# Altium PCB Kasli-DIOT.PCBDOC (part 22 of 23)
Units mm, origin at the board's own origin, x right, y up, seen from the top; angles counter-clockwise.
Board outline 222.9 x 100 mm, 10 copper layers (TopLayer, Layer 2, Layer 3, Layer 4, Layer 5, Layer 6, Layer 7, layer 8, Layer 9, BottomLayer), stack 1.564 mm thick; 977 components, 900 nets, 4676 pads, 2725 vias.
Unrouted connection lines stored in the file: 17.
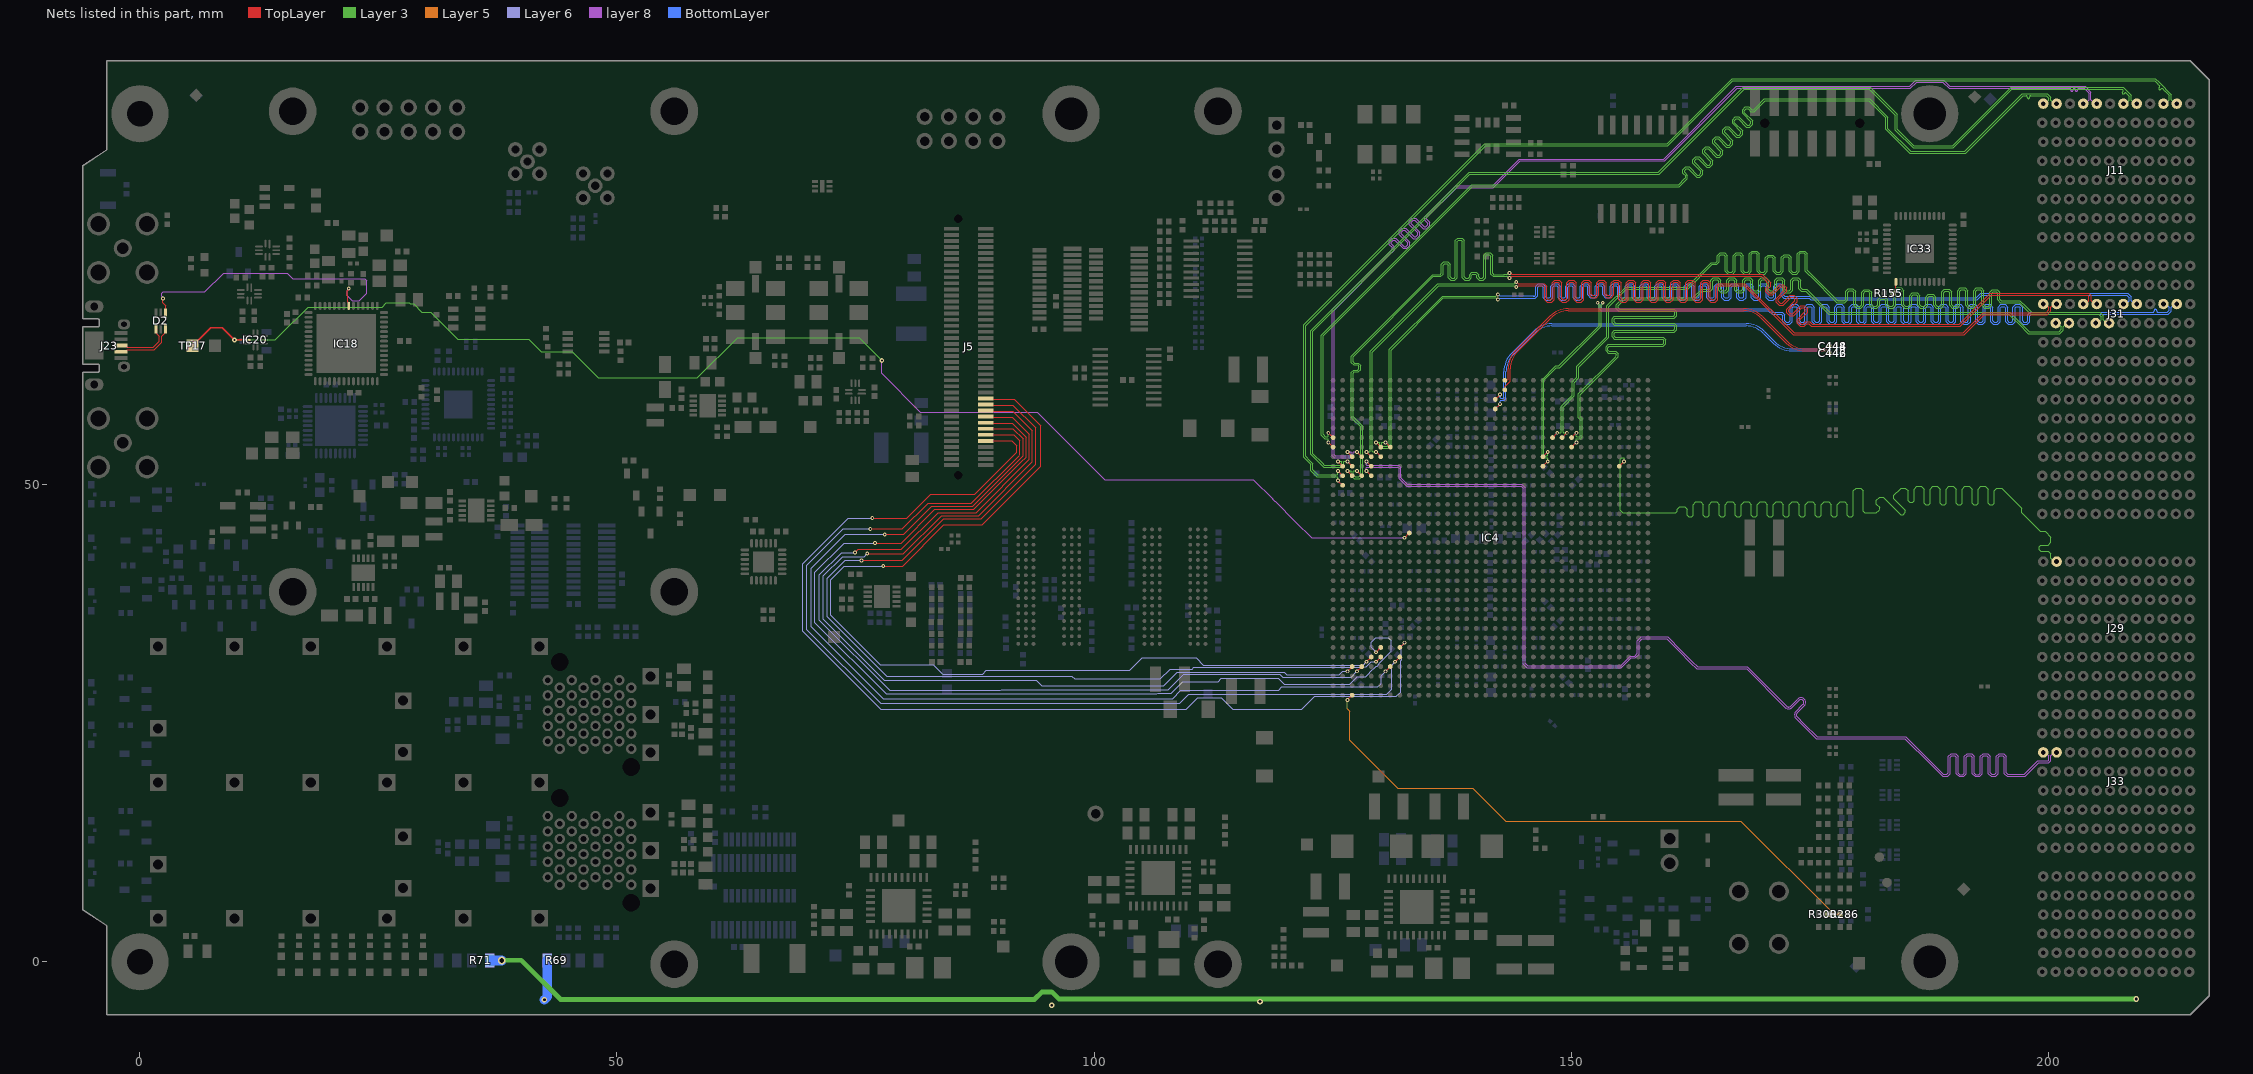
[diagram p28: the nets of this part, all layers, seen from the top]

## Via types
v1: diameter 0.4, hole 0.2, TopLayer to BottomLayer, tented both sides, 1723 vias
v2: diameter 0.5, hole 0.2, TopLayer to BottomLayer, tented both sides, 524 vias
v3: diameter 0.6, hole 0.3, TopLayer to BottomLayer, tented both sides, 172 vias
v4: diameter 0.6, hole 0.3, TopLayer to BottomLayer, 113 vias
v5: diameter 0.5, hole 0.2, TopLayer to BottomLayer, 107 vias
v6: diameter 0.4, hole 0.2, TopLayer to BottomLayer, 67 vias
v7: diameter 0.5, hole 0.25, TopLayer to BottomLayer, tented both sides, 12 vias
v8: diameter 0.8, hole 0.5, TopLayer to BottomLayer, tented both sides, 7 vias

## Nets (pads, with @x,y where several pads share a name; then routed paths per layer and width w, separated by ;. In a path a pad name is that pad's centre, name@x,y a point inside that pad or via, vN(x,y) a via of type N, cw(c..) or ccw(c..) an arc to the next point about the centre after c; other vN are vias at no path point) (continued)
SLOT8.LVDS_4_P: IC4.K31 J29.K8 | length 117
  TopLayer w0.095: IC4.K31@155.061,51.95 v1(155.561,52.45)
  Layer 3 w0.075: v1(155.561,52.45) 155.561,52.805 155.517,52.849 155.307,52.849 155.161,52.703 155.161,47.335 155.444,47.052 160.887,47.052 160.984,47.052 161.143,47.211 161.143,47.43 161.42,47.707 161.906,47.707 162.184,47.43 162.184,46.808 162.343,46.649 162.662,46.649 162.821,46.808 162.821,47.921 163.098,48.199 163.584,48.199 163.862,47.921 163.862,46.808 164.021,46.649 164.34,46.649 164.499,46.808 164.499,47.921 164.776,48.199 165.262,48.199 165.54,47.921 165.54,46.808 165.699,46.649 166.018,46.649 166.177,46.808 166.177,47.921 166.454,48.199 166.94,48.199 167.218,47.921 167.218,46.808 167.377,46.649 167.696,46.649 167.855,46.808 167.855,47.921 168.132,48.199 168.618,48.199 168.896,47.921 168.896,46.808 169.055,46.649 169.374,46.649 169.533,46.808 169.533,47.921 169.81,48.199 170.296,48.199 170.574,47.921 170.574,46.808 170.733,46.649 171.052,46.649 171.211,46.808 171.211,47.921 171.488,48.199 171.974,48.199 172.252,47.921 172.252,46.808 172.411,46.649 172.73,46.649 172.889,46.808 172.889,47.921 173.166,48.199 173.652,48.199 173.93,47.921 173.93,46.808 174.089,46.649 174.408,46.649 174.567,46.808 174.567,47.921 174.844,48.199 175.33,48.199 175.608,47.921 175.608,46.808 175.767,46.649 176.086,46.649 176.245,46.808 176.245,47.921 176.522,48.199 177.008,48.199 177.286,47.921 177.286,46.808 177.445,46.649 177.764,46.649 177.923,46.808 177.923,47.921 178.2,48.199 178.686,48.199 178.964,47.921 178.964,46.808 179.123,46.649 179.442,46.649 179.601,46.808 179.601,49.359 179.878,49.636 180.364,49.636 180.642,49.359 180.642,47.211 180.801,47.052 181.126,47.052 181.995,47.052 182.29,47.346 182.358,47.415 182.358,47.64 182.016,47.982 182.016,48.375 182.359,48.718 182.752,48.718 184.585,46.885 184.81,46.885 185.035,47.11 185.035,47.336 183.853,48.517 183.853,48.91 184.536,49.593 184.595,49.652 184.791,49.652 185.055,49.652 185.333,49.374 185.333,48.325 185.492,48.166 185.811,48.166 185.97,48.325 185.97,49.554 186.247,49.831 186.733,49.831 187.011,49.554 187.011,48.083 187.17,47.924 187.489,47.924 187.648,48.083 187.648,49.554 187.925,49.831 188.411,49.831 188.689,49.554 188.689,48.083 188.848,47.924 189.167,47.924 189.326,48.083 189.326,49.554 189.603,49.831 190.089,49.831 190.367,49.554 190.367,48.083 190.526,47.924 190.845,47.924 191.004,48.083 191.004,49.554 191.281,49.831 191.767,49.831 192.045,49.554 192.045,48.083 192.204,47.924 192.523,47.924 192.682,48.083 192.682,49.554 192.959,49.831 193.445,49.831 193.723,49.554 193.723,48.083 193.882,47.924 194.201,47.924 194.36,48.083 194.36,49.374 194.637,49.652 194.818,49.652 195.174,49.652 197.259,47.567 197.259,47.049 199.196,45.112 199.714,45.112 200.301,44.525 200.301,44.42 200.301,43.965 200.023,43.688 199.214,43.688 199.054,43.529 199.054,43.21 199.214,43.051 200.023,43.051 200.301,42.773 200.301,42.593 200.301,42.311 200.662,41.95 J29.K8@200.9,41.95
SLOT8.LVDS_5_N: IC4.G25 J31.H3 | length 119.3
  TopLayer w0.095: IC4.G25@149.061,54.95 v1(149.561,55.45)
  Layer 3 w0.075: v1(149.561,55.45) 149.206,55.45 149.162,55.494 149.162,58.151 150.325,59.314 150.325,60.714 150.807,61.196 150.807,62.326 153.93,65.45 153.93,68.654 155.795,70.52 162.225,70.52 164.8,73.095 165.088,73.095 165.268,73.095 165.546,73.372 165.546,73.951 165.705,74.11 166.023,74.11 166.183,73.951 166.183,72.359 166.46,72.081 166.946,72.081 167.224,72.359 167.224,73.951 167.383,74.111 167.701,74.111 167.861,73.951 167.861,72.359 168.138,72.081 168.624,72.081 168.902,72.359 168.902,74.143 169.061,74.303 169.379,74.303 169.539,74.143 169.539,72.359 169.816,72.081 170.302,72.081 170.58,72.359 170.58,73.721 170.739,73.88 171.057,73.88 171.217,73.721 171.217,72.359 171.494,72.081 171.98,72.081 172.258,72.359 172.258,73.764 172.417,73.924 172.735,73.924 172.895,73.764 172.895,72.359 173.172,72.081 173.658,72.081 173.936,72.359 173.936,74.143 174.095,74.303 174.413,74.303 174.573,74.143 174.573,72.4 174.996,71.977 175.064,71.909 177.866,69.107 178.536,69.107 178.716,69.107 178.994,69.385 178.994,70.202 179.153,70.361 179.472,70.361 179.631,70.202 179.631,68.804 179.909,68.526 180.394,68.526 180.672,68.804 180.672,70.105 180.831,70.264 181.15,70.264 181.309,70.105 181.309,68.804 181.587,68.526 182.072,68.526 182.35,68.804 182.35,69.297 182.509,69.456 182.828,69.456 182.987,69.297 182.987,68.804 183.265,68.526 183.75,68.526 184.028,68.804 184.028,70.282 184.187,70.441 184.506,70.441 184.665,70.282 184.665,68.804 184.943,68.526 185.428,68.526 185.706,68.804 185.706,69.751 185.865,69.911 186.184,69.911 186.343,69.751 186.343,68.804 186.621,68.526 187.106,68.526 187.384,68.804 187.384,69.598 187.543,69.757 187.862,69.757 188.021,69.598 188.021,68.804 188.299,68.526 188.784,68.526 189.062,68.804 189.062,70.15 189.221,70.31 189.54,70.31 189.699,70.15 189.699,68.804 189.977,68.526 190.462,68.526 190.74,68.804 190.74,70.282 190.899,70.441 191.218,70.441 191.377,70.282 191.377,68.804 191.655,68.526 192.14,68.526 192.418,68.804 192.418,70.282 192.577,70.441 192.896,70.441 193.055,70.282 193.055,68.804 193.333,68.526 193.818,68.526 194.096,68.804 194.096,70.082 194.255,70.241 194.574,70.241 194.733,70.082 194.733,69.385 195.011,69.107 195.76,69.107 196.974,69.107 197.674,68.407 198.19,67.891 205.338,67.891 205.599,67.63 205.599,67.311 205.238,66.95 J31.H3@205,66.95
SLOT8.LVDS_5_P: IC4.G24 J31.G3 | length 120
  TopLayer w0.095: IC4.G24@148.061,54.95 v1(148.561,55.45)
  Layer 3 w0.075: v1(148.561,55.45) 148.916,55.45 148.96,55.494 148.96,58.235 150.123,59.398 150.123,60.798 150.605,61.28 150.605,62.41 153.728,65.533 153.728,68.73 ccw(c153.322,69.083) 153.758,68.768 155.712,70.722 162.141,70.722 164.716,73.297 165.088,73.297 165.184,73.297 165.344,73.456 165.344,74.035 165.621,74.313 166.107,74.313 166.385,74.035 166.385,72.443 166.544,72.283 166.862,72.283 167.022,72.443 167.022,74.035 167.299,74.313 167.785,74.313 168.063,74.035 168.063,72.443 168.222,72.283 168.54,72.283 168.7,72.443 168.7,74.227 168.977,74.505 169.463,74.505 169.741,74.227 169.741,72.443 169.9,72.283 170.218,72.283 170.378,72.443 170.378,73.804 170.655,74.082 171.141,74.082 171.419,73.804 171.419,72.443 171.578,72.283 171.896,72.283 172.056,72.443 172.056,73.848 172.333,74.126 172.819,74.126 173.097,73.848 173.097,72.443 173.256,72.283 173.574,72.283 173.734,72.443 173.734,74.227 174.011,74.505 174.497,74.505 174.775,74.227 174.775,72.484 174.996,72.263 175.064,72.195 177.95,69.309 178.536,69.309 178.633,69.309 178.792,69.468 178.792,70.285 179.07,70.563 179.555,70.563 179.833,70.285 179.833,68.888 179.992,68.728 180.311,68.728 180.47,68.888 180.47,70.188 180.748,70.466 181.233,70.466 181.511,70.188 181.511,68.888 181.67,68.728 181.989,68.728 182.148,68.888 182.148,69.38 182.426,69.658 182.911,69.658 183.189,69.38 183.189,68.888 183.348,68.728 183.667,68.728 183.826,68.888 183.826,70.365 184.104,70.643 184.589,70.643 184.867,70.365 184.867,68.888 185.026,68.728 185.345,68.728 185.504,68.888 185.504,69.835 185.782,70.113 186.267,70.113 186.545,69.835 186.545,68.888 186.704,68.728 187.023,68.728 187.182,68.888 187.182,69.681 187.46,69.959 187.945,69.959 188.223,69.681 188.223,68.888 188.382,68.728 188.701,68.728 188.86,68.888 188.86,70.234 189.138,70.512 189.623,70.512 189.901,70.234 189.901,68.888 190.06,68.728 190.379,68.728 190.538,68.888 190.538,70.365 190.816,70.643 191.301,70.643 191.579,70.365 191.579,68.888 191.738,68.728 192.057,68.728 192.216,68.888 192.216,70.365 192.494,70.643 192.979,70.643 193.257,70.365 193.257,68.888 193.416,68.728 193.735,68.728 193.894,68.888 193.894,70.166 194.172,70.443 194.657,70.443 194.935,70.166 194.935,69.468 195.094,69.309 195.76,69.309 197.058,69.309 197.674,68.693 198.274,68.093 205.421,68.093 205.801,67.714 205.801,67.311 206.162,66.95 J31.G3@206.4,66.95
SLOT8.LVDS_6_N: IC4.G26 J31.K3 | length 117.4
  TopLayer w0.095: IC4.G26@150.061,54.95 v1(150.561,55.45)
  Layer 3 w0.075: v1(150.561,55.45) 150.561,55.095 150.605,55.051 150.917,55.051 150.961,55.095 150.961,56.85 150.761,57.05 150.761,59.536 154.673,63.448 154.757,63.532 154.757,63.647 154.623,63.781 153.927,63.781 153.674,64.034 153.674,64.47 153.927,64.722 159.598,64.722 159.732,64.857 159.732,65.125 159.598,65.259 154.558,65.259 154.305,65.512 154.305,65.948 154.558,66.2 160.748,66.2 160.882,66.335 160.882,66.603 160.748,66.737 154.558,66.737 154.305,66.99 154.305,67.426 154.558,67.678 160.748,67.678 160.882,67.813 160.882,68.081 160.748,68.215 155.01,68.215 154.757,68.468 154.757,68.648 154.757,68.847 155.509,69.6 162.78,69.6 163.679,70.498 164.388,70.498 164.485,70.498 164.644,70.658 164.644,71.429 164.922,71.706 165.408,71.706 165.685,71.429 165.685,70.479 165.845,70.32 166.163,70.32 166.322,70.479 166.322,71.429 166.6,71.706 167.086,71.706 167.363,71.429 167.363,70.479 167.523,70.32 167.841,70.32 168,70.479 168,71.429 168.278,71.706 168.764,71.706 169.041,71.429 169.041,70.479 169.201,70.32 169.519,70.32 169.678,70.479 169.678,71.429 169.956,71.706 170.442,71.706 170.719,71.429 170.719,70.479 170.879,70.32 171.197,70.32 171.356,70.479 171.356,71.429 171.634,71.706 172.12,71.706 172.397,71.429 172.397,70.479 172.557,70.32 172.875,70.32 173.034,70.479 173.034,71.429 173.312,71.706 173.798,71.706 174.075,71.429 174.075,70.658 174.235,70.498 174.573,70.498 174.691,70.498 175.536,69.653 176.239,68.95 177.096,68.093 195.981,68.093 196.624,67.45 197.124,66.95 198.024,66.05 201.17,66.05 201.399,66.279 201.399,66.589 201.038,66.95 J31.K3@200.8,66.95
SLOT8.LVDS_6_P: IC4.H26 J31.J3 | length 117.7
  TopLayer w0.095: IC4.H26@150.061,53.95 v1(150.561,54.45)
  Layer 3 w0.075: v1(150.561,54.45) 150.561,54.805 150.605,54.849 151.001,54.849 151.163,55.011 151.163,56.934 150.963,57.134 150.963,59.452 154.959,63.448 154.959,63.731 154.706,63.983 154.01,63.983 153.876,64.118 153.876,64.386 154.01,64.52 159.682,64.52 159.934,64.773 159.934,65.209 159.682,65.461 154.641,65.461 154.507,65.596 154.507,65.864 154.641,65.998 160.831,65.998 161.084,66.251 161.084,66.687 160.831,66.939 154.641,66.939 154.507,67.074 154.507,67.342 154.641,67.476 160.831,67.476 161.084,67.729 161.084,68.165 160.831,68.417 155.093,68.417 154.959,68.552 154.959,68.648 154.959,68.764 155.593,69.398 162.864,69.398 163.763,70.296 164.388,70.296 164.569,70.296 164.846,70.574 164.846,71.345 165.006,71.504 165.324,71.504 165.483,71.345 165.483,70.395 165.761,70.118 166.247,70.118 166.524,70.395 166.524,71.345 166.684,71.504 167.002,71.504 167.161,71.345 167.161,70.395 167.439,70.118 167.925,70.118 168.202,70.395 168.202,71.345 168.362,71.504 168.68,71.504 168.839,71.345 168.839,70.395 169.117,70.118 169.603,70.118 169.88,70.395 169.88,71.345 170.04,71.504 170.358,71.504 170.517,71.345 170.517,70.395 170.795,70.118 171.281,70.118 171.558,70.395 171.558,71.345 171.718,71.504 172.036,71.504 172.195,71.345 172.195,70.395 172.473,70.118 172.959,70.118 173.236,70.395 173.236,71.345 173.396,71.504 173.714,71.504 173.873,71.345 173.873,70.574 174.151,70.296 174.573,70.296 174.607,70.296 175.334,69.569 176.025,68.879 177.012,67.891 195.897,67.891 196.422,67.366 196.909,66.879 197.94,65.848 201.253,65.848 201.601,66.195 201.601,66.589 201.962,66.95 J31.J3@202.2,66.95
SLOT8.LVDS_7_N: IC4.J23 J31.C4 | length 135.5
  TopLayer w0.095: IC4.J23@147.061,52.95 v1(147.561,53.45)
  Layer 3 w0.075: v1(147.561,53.45) 147.561,53.095 147.517,53.051 147.254,53.051 147.161,53.144 147.161,60.95 148.462,62.251 148.8,62.251 153.16,66.611 153.16,68.876 153.322,69.039 v1(153.322,69.083)
  BottomLayer w0.095: v1(153.322,69.083) 153.322,69.027 153.17,68.874 153.17,68.541 153.239,68.472 170.789,68.472 170.919,68.342 171.164,68.097 171.884,68.097 172.129,68.097 172.399,67.828 172.399,67.183 172.538,67.043 172.816,67.043 172.956,67.183 172.956,68.636 173.225,68.905 173.687,68.905 173.957,68.636 173.957,67.183 174.096,67.043 174.374,67.043 174.514,67.183 174.514,68.636 174.783,68.905 175.245,68.905 175.515,68.636 175.515,67.183 175.654,67.043 175.932,67.043 176.072,67.183 176.072,68.636 176.341,68.905 176.803,68.905 177.073,68.636 177.073,67.183 177.212,67.043 177.49,67.043 177.63,67.183 177.63,68.636 177.899,68.905 178.361,68.905 178.631,68.636 178.631,67.183 178.77,67.043 179.048,67.043 179.188,67.183 179.188,68.636 179.457,68.905 179.919,68.905 180.189,68.636 180.189,67.183 180.328,67.043 180.606,67.043 180.746,67.183 180.746,68.636 181.015,68.905 181.477,68.905 181.747,68.636 181.747,67.183 181.886,67.043 182.164,67.043 182.304,67.183 182.304,68.636 182.573,68.905 183.035,68.905 183.305,68.636 183.305,67.183 183.444,67.043 183.722,67.043 183.862,67.183 183.862,68.636 184.131,68.905 184.593,68.905 184.863,68.636 184.863,67.183 185.002,67.043 185.28,67.043 185.42,67.183 185.42,68.636 185.689,68.905 186.151,68.905 186.421,68.636 186.421,67.183 186.56,67.043 186.838,67.043 186.978,67.183 186.978,68.636 187.247,68.905 187.709,68.905 187.979,68.636 187.979,67.183 188.118,67.043 188.396,67.043 188.536,67.183 188.536,68.636 188.805,68.905 189.267,68.905 189.537,68.636 189.537,67.183 189.676,67.043 189.954,67.043 190.094,67.183 190.094,68.636 190.363,68.905 190.825,68.905 191.095,68.636 191.095,67.183 191.234,67.043 191.512,67.043 191.652,67.183 191.652,68.636 191.921,68.905 192.383,68.905 192.653,68.636 192.653,67.183 192.792,67.043 193.07,67.043 193.21,67.183 193.21,68.636 193.479,68.905 193.941,68.905 194.211,68.636 194.211,67.183 194.35,67.043 194.628,67.043 194.768,67.183 194.768,68.636 195.037,68.905 195.499,68.905 195.769,68.636 195.769,67.183 195.908,67.043 196.186,67.043 196.326,67.183 196.326,68.636 196.595,68.905 197.057,68.905 197.327,68.636 197.327,67.183 197.466,67.043 197.744,67.043 197.884,67.183 197.884,67.828 198.153,68.097 198.357,68.097 210.953,68.097 211,68.097 ccw(c211,68.225) 211.129,68.225 211.129,68.264 cw(c211.257,68.264) 211.386,68.264 211.386,68.225 ccw(c211.514,68.225) 211.514,68.097 212.124,68.097 212.49,68.097 212.689,68.295 212.689,68.593 212.332,68.95 J31.C4@212.1,68.95
SLOT8.LVDS_7_P: IC4.K23 J31.B4 | length 136.2
  TopLayer w0.095: IC4.K23@147.061,51.95 v1(147.561,52.45)
  Layer 3 w0.075: v1(147.561,52.45) 147.561,52.805 147.517,52.849 147.17,52.849 146.959,53.06 146.959,61.034 148.378,62.453 148.716,62.453 152.958,66.695 152.958,68.876 152.795,69.039 v1(152.795,69.083)
  BottomLayer w0.095: v1(152.795,69.083) 152.795,69.027 152.948,68.874 152.948,68.449 153.147,68.25 170.697,68.25 171.072,67.875 171.884,67.875 172.037,67.875 172.177,67.736 172.177,67.091 172.446,66.821 172.908,66.821 173.178,67.091 173.178,68.544 173.317,68.683 173.595,68.683 173.735,68.544 173.735,67.091 174.004,66.821 174.466,66.821 174.736,67.091 174.736,68.544 174.875,68.683 175.153,68.683 175.293,68.544 175.293,67.091 175.562,66.821 176.024,66.821 176.294,67.091 176.294,68.544 176.433,68.683 176.711,68.683 176.851,68.544 176.851,67.091 177.12,66.821 177.582,66.821 177.852,67.091 177.852,68.544 177.991,68.683 178.269,68.683 178.409,68.544 178.409,67.091 178.678,66.821 179.14,66.821 179.41,67.091 179.41,68.544 179.549,68.683 179.827,68.683 179.967,68.544 179.967,67.091 180.236,66.821 180.698,66.821 180.968,67.091 180.968,68.544 181.107,68.683 181.385,68.683 181.525,68.544 181.525,67.091 181.794,66.821 182.256,66.821 182.526,67.091 182.526,68.544 182.665,68.683 182.943,68.683 183.083,68.544 183.083,67.091 183.352,66.821 183.814,66.821 184.084,67.091 184.084,68.544 184.223,68.683 184.501,68.683 184.641,68.544 184.641,67.091 184.91,66.821 185.372,66.821 185.642,67.091 185.642,68.544 185.781,68.683 186.059,68.683 186.199,68.544 186.199,67.091 186.468,66.821 186.93,66.821 187.2,67.091 187.2,68.544 187.339,68.683 187.617,68.683 187.757,68.544 187.757,67.091 188.026,66.821 188.488,66.821 188.758,67.091 188.758,68.544 188.897,68.683 189.175,68.683 189.315,68.544 189.315,67.091 189.584,66.821 190.046,66.821 190.316,67.091 190.316,68.544 190.455,68.683 190.733,68.683 190.873,68.544 190.873,67.091 191.142,66.821 191.604,66.821 191.874,67.091 191.874,68.544 192.013,68.683 192.291,68.683 192.431,68.544 192.431,67.091 192.7,66.821 193.162,66.821 193.432,67.091 193.432,68.544 193.571,68.683 193.849,68.683 193.989,68.544 193.989,67.091 194.258,66.821 194.72,66.821 194.99,67.091 194.99,68.544 195.129,68.683 195.407,68.683 195.547,68.544 195.547,67.091 195.816,66.821 196.278,66.821 196.548,67.091 196.548,68.544 196.687,68.683 196.965,68.683 197.105,68.544 197.105,67.091 197.374,66.821 197.836,66.821 198.106,67.091 198.106,67.736 198.245,67.875 198.357,67.875 212.582,67.875 212.911,68.203 212.911,68.593 213.268,68.95 J31.B4@213.5,68.95
SLOT8.LVDS_8_N: IC4.H6 J31.F4 | length 134.8
  TopLayer w0.095: v1(129.561,54.45) IC4.H6@130.061,53.95
  Layer 3 w0.075: v1(129.561,54.45) 129.916,54.45 129.96,54.406 129.96,54.05 130.162,53.848 130.845,53.848 131.161,54.164 131.161,64.117 136.628,69.584 142.121,69.584 142.283,69.421 v1(142.327,69.421)
  BottomLayer w0.095: v1(142.327,69.421) 142.383,69.421 142.535,69.574 145.945,69.574 145.969,69.55 146.061,69.55 146.265,69.55 146.535,69.819 146.535,70.705 146.674,70.844 146.953,70.844 147.092,70.705 147.092,69.632 147.361,69.363 147.823,69.363 148.093,69.632 148.093,70.705 148.232,70.844 148.511,70.844 148.65,70.705 148.65,69.632 148.919,69.363 149.381,69.363 149.651,69.632 149.651,70.705 149.79,70.844 150.069,70.844 150.208,70.705 150.208,69.632 150.477,69.363 150.94,69.363 151.209,69.632 151.209,70.705 151.348,70.844 151.627,70.844 151.766,70.705 151.766,69.899 152.035,69.63 152.498,69.63 152.767,69.899 152.767,70.705 152.906,70.844 153.185,70.844 153.324,70.705 153.324,69.899 153.593,69.63 154.056,69.63 154.325,69.899 154.325,70.705 154.464,70.844 154.743,70.844 154.882,70.705 154.882,69.632 155.151,69.363 155.614,69.363 155.883,69.632 155.883,70.705 156.022,70.844 156.301,70.844 156.44,70.705 156.44,69.632 156.709,69.363 157.172,69.363 157.441,69.632 157.441,70.705 157.58,70.844 157.859,70.844 157.998,70.705 157.998,69.632 158.267,69.363 158.73,69.363 158.999,69.632 158.999,70.705 159.138,70.844 159.417,70.844 159.556,70.705 159.556,69.632 159.825,69.363 160.288,69.363 160.557,69.632 160.557,70.705 160.696,70.844 160.975,70.844 161.114,70.705 161.114,69.632 161.383,69.363 161.846,69.363 162.115,69.632 162.115,70.705 162.254,70.844 162.533,70.844 162.672,70.705 162.672,69.632 162.941,69.363 163.404,69.363 163.673,69.632 163.673,70.705 163.812,70.844 164.091,70.844 164.23,70.705 164.23,69.632 164.499,69.363 164.962,69.363 165.231,69.632 165.231,70.705 165.37,70.844 165.649,70.844 165.788,70.705 165.788,69.632 166.057,69.363 166.52,69.363 166.789,69.632 166.789,70.705 166.928,70.844 167.207,70.844 167.346,70.705 167.346,69.632 167.615,69.363 168.078,69.363 168.347,69.632 168.347,70.705 168.486,70.844 168.765,70.844 168.904,70.705 168.904,69.632 169.173,69.363 169.636,69.363 169.905,69.632 169.905,70.705 170.044,70.844 170.323,70.844 170.462,70.705 170.462,69.632 170.731,69.363 171.194,69.363 171.463,69.632 171.463,70.705 171.602,70.844 171.881,70.844 172.02,70.705 172.02,69.819 172.289,69.55 173.202,69.55 174.947,69.55 175.119,69.378 192.589,69.378 193.061,69.85 208.262,69.85 208.489,69.624 208.489,69.307 208.132,68.95 J31.F4@207.9,68.95
SLOT8.LVDS_8_P: IC4.H7 J31.E4 | length 134.8
  TopLayer w0.095: v1(130.561,54.45) IC4.H7@131.061,53.95
  Layer 3 w0.075: v1(130.561,54.45) 130.206,54.45 130.162,54.406 130.162,54.134 130.246,54.05 130.761,54.05 130.959,54.248 130.959,64.2 136.545,69.786 142.121,69.786 142.283,69.948 v1(142.327,69.948)
  BottomLayer w0.095: v1(142.327,69.948) 142.383,69.948 142.535,69.796 146.037,69.796 146.061,69.772 146.174,69.772 146.313,69.911 146.313,70.797 146.582,71.066 147.044,71.066 147.314,70.797 147.314,69.724 147.453,69.585 147.732,69.585 147.871,69.724 147.871,70.797 148.14,71.066 148.602,71.066 148.872,70.797 148.872,69.724 149.011,69.585 149.29,69.585 149.429,69.724 149.429,70.797 149.698,71.066 150.161,71.066 150.43,70.797 150.43,69.724 150.569,69.585 150.848,69.585 150.987,69.724 150.987,70.797 151.256,71.066 151.719,71.066 151.988,70.797 151.988,69.991 152.127,69.852 152.406,69.852 152.545,69.991 152.545,70.797 152.814,71.066 153.277,71.066 153.546,70.797 153.546,69.991 153.685,69.852 153.964,69.852 154.103,69.991 154.103,70.797 154.372,71.066 154.835,71.066 155.104,70.797 155.104,69.724 155.243,69.585 155.522,69.585 155.661,69.724 155.661,70.797 155.93,71.066 156.393,71.066 156.662,70.797 156.662,69.724 156.801,69.585 157.08,69.585 157.219,69.724 157.219,70.797 157.488,71.066 157.951,71.066 158.22,70.797 158.22,69.724 158.359,69.585 158.638,69.585 158.777,69.724 158.777,70.797 159.046,71.066 159.509,71.066 159.778,70.797 159.778,69.724 159.917,69.585 160.196,69.585 160.335,69.724 160.335,70.797 160.604,71.066 161.067,71.066 161.336,70.797 161.336,69.724 161.475,69.585 161.754,69.585 161.893,69.724 161.893,70.797 162.162,71.066 162.625,71.066 162.894,70.797 162.894,69.724 163.033,69.585 163.312,69.585 163.451,69.724 163.451,70.797 163.72,71.066 164.183,71.066 164.452,70.797 164.452,69.724 164.591,69.585 164.87,69.585 165.009,69.724 165.009,70.797 165.278,71.066 165.741,71.066 166.01,70.797 166.01,69.724 166.149,69.585 166.428,69.585 166.567,69.724 166.567,70.797 166.836,71.066 167.299,71.066 167.568,70.797 167.568,69.724 167.707,69.585 167.986,69.585 168.125,69.724 168.125,70.797 168.394,71.066 168.857,71.066 169.126,70.797 169.126,69.724 169.265,69.585 169.544,69.585 169.683,69.724 169.683,70.797 169.952,71.066 170.415,71.066 170.684,70.797 170.684,69.724 170.823,69.585 171.102,69.585 171.241,69.724 171.241,70.797 171.51,71.066 171.973,71.066 172.242,70.797 172.242,69.911 172.381,69.772 173.202,69.772 175.039,69.772 175.211,69.6 192.497,69.6 192.969,70.072 208.354,70.072 208.711,69.716 208.711,69.307 209.068,68.95 J31.E4@209.3,68.95
SLOT8.LVDS_9_N: IC4.L3 J31.I4 | length 127.6
  TopLayer w0.095: v1(126.561,51.45) IC4.L3@127.061,50.95 ; v1(143.561,71.682) 143.617,71.682 143.769,71.835 169.962,71.835 170.246,71.551 170.698,71.099 170.698,70.902 170.415,70.62 170.415,70.239 170.742,69.912 171.123,69.912 171.977,70.766 172.174,70.766 172.371,70.569 172.371,70.372 171.517,69.518 171.517,69.137 171.844,68.81 172.225,68.81 173.079,69.664 173.276,69.664 173.473,69.467 173.473,69.27 172.619,68.416 172.619,68.036 172.946,67.709 173.327,67.709 174.18,68.562 174.377,68.562 174.574,68.365 174.574,68.169 173.72,67.315 173.72,66.934 174.047,66.607 174.428,66.607 174.711,66.889 174.908,66.889 174.987,66.81 175.11,66.687 175.175,66.622 190.808,66.622 194.033,69.847 204.166,69.847 204.289,69.724 204.289,69.307 203.932,68.95 J31.I4@203.7,68.95
  Layer 3 w0.075: v1(126.561,51.45) 126.916,51.45 126.96,51.406 126.96,50.966 127.278,50.648 127.845,50.648 128.163,50.966 128.163,56.148 128.045,56.266 127.161,57.15 127.161,61.034 127.161,61.692 127.295,61.826 127.716,61.826 127.969,62.078 127.969,62.514 127.716,62.767 127.295,62.767 127.161,62.901 127.161,62.998 127.161,63.417 135.585,71.841 136.176,71.841 136.357,71.841 136.609,72.093 136.609,73.034 136.744,73.168 137.012,73.168 137.146,73.034 137.146,71.714 137.399,71.461 137.835,71.461 138.087,71.714 138.087,75.525 138.222,75.659 138.49,75.659 138.624,75.525 138.624,71.714 138.877,71.461 139.313,71.461 139.565,71.714 139.565,71.943 139.7,72.077 139.968,72.077 140.102,71.943 140.102,71.714 140.355,71.461 140.791,71.461 141.043,71.714 141.043,73.968 141.178,74.102 141.446,74.102 141.58,73.968 141.58,72.093 141.833,71.841 142.174,71.841 143.06,71.841 143.065,71.845 143.24,71.845 cw(c143.24,71.568) 143.329,71.83 cw(c143.24,71.568) 143.436,71.764 143.486,71.714 ccw(c143.561,71.789) v1(143.561,71.682)
SLOT8.LVDS_9_P: IC4.L4 J31.H4 | length 127.7
  TopLayer w0.095: v1(127.561,51.45) IC4.L4@128.061,50.95 ; v1(143.561,72.209) 143.617,72.209 143.769,72.057 169.864,72.057 170.054,72.057 170.403,71.708 170.92,71.191 170.92,70.81 170.637,70.528 170.637,70.331 170.834,70.134 171.031,70.134 171.885,70.988 172.266,70.988 172.593,70.661 172.593,70.28 171.739,69.426 171.739,69.229 171.936,69.032 172.133,69.032 172.987,69.886 173.368,69.886 173.695,69.559 173.695,69.178 172.841,68.324 172.841,68.128 173.038,67.931 173.235,67.931 174.088,68.784 174.469,68.784 174.796,68.457 174.796,68.077 173.942,67.223 173.942,67.026 174.139,66.829 174.336,66.829 174.619,67.111 175,67.111 175.065,67.046 175.144,66.967 175.267,66.844 190.716,66.844 193.941,70.069 204.258,70.069 204.511,69.816 204.511,69.307 204.868,68.95 J31.H4@205.1,68.95
  Layer 3 w0.075: v1(127.561,51.45) 127.206,51.45 127.162,51.406 127.162,51.05 127.362,50.85 127.761,50.85 127.961,51.05 127.961,56.064 127.077,56.948 126.959,57.066 126.959,61.034 126.959,61.775 127.212,62.028 127.633,62.028 127.767,62.162 127.767,62.431 127.633,62.565 127.212,62.565 126.959,62.817 126.959,62.998 126.959,63.5 135.502,72.043 136.176,72.043 136.273,72.043 136.407,72.177 136.407,73.118 136.66,73.37 137.096,73.37 137.348,73.118 137.348,71.797 137.483,71.663 137.751,71.663 137.885,71.797 137.885,75.609 138.138,75.861 138.574,75.861 138.826,75.609 138.826,71.797 138.961,71.663 139.229,71.663 139.363,71.797 139.363,72.027 139.616,72.279 140.052,72.279 140.304,72.027 140.304,71.797 140.439,71.663 140.707,71.663 140.841,71.797 140.841,74.051 141.094,74.304 141.53,74.304 141.782,74.051 141.782,72.177 141.917,72.043 142.174,72.043 142.977,72.043 142.981,72.047 143.24,72.047 ccw(c143.24,72.324) 143.328,72.062 ccw(c143.24,72.324) 143.436,72.128 143.486,72.178 cw(c143.561,72.103) v1(143.561,72.209)
SLOT8.LVDS_10_N: IC4.J5 J31.L4 | length 131.2
  TopLayer w0.095: v1(128.561,53.45) IC4.J5@129.061,52.95 ; v1(144.261,71.249) 144.317,71.249 144.469,71.096 145.726,71.096 147.183,71.096 147.452,70.827 147.452,69.513 147.591,69.374 147.87,69.374 148.009,69.513 148.009,71.171 148.278,71.44 148.741,71.44 149.01,71.171 149.01,69.513 149.149,69.374 149.428,69.374 149.567,69.513 149.567,71.171 149.836,71.44 150.299,71.44 150.568,71.171 150.568,69.513 150.707,69.374 150.986,69.374 151.125,69.513 151.125,71.171 151.394,71.44 151.857,71.44 152.126,71.171 152.126,69.991 152.265,69.852 152.544,69.852 152.683,69.991 152.683,71.171 152.952,71.44 153.415,71.44 153.684,71.171 153.684,69.991 153.823,69.852 154.102,69.852 154.241,69.991 154.241,71.171 154.51,71.44 154.973,71.44 155.242,71.171 155.242,69.513 155.381,69.374 155.66,69.374 155.799,69.513 155.799,71.171 156.068,71.44 156.531,71.44 156.8,71.171 156.8,69.513 156.939,69.374 157.218,69.374 157.357,69.513 157.357,71.171 157.626,71.44 158.089,71.44 158.358,71.171 158.358,69.513 158.497,69.374 158.776,69.374 158.915,69.513 158.915,71.171 159.184,71.44 159.647,71.44 159.916,71.171 159.916,69.513 160.055,69.374 160.334,69.374 160.473,69.513 160.473,71.171 160.742,71.44 161.205,71.44 161.474,71.171 161.474,69.513 161.613,69.374 161.892,69.374 162.031,69.513 162.031,71.171 162.3,71.44 162.763,71.44 163.032,71.171 163.032,69.513 163.171,69.374 163.45,69.374 163.589,69.513 163.589,71.171 163.858,71.44 164.321,71.44 164.59,71.171 164.59,69.513 164.729,69.374 165.008,69.374 165.147,69.513 165.147,70.827 165.416,71.096 165.621,71.096 168.233,71.096 173.394,65.934 191.106,65.934 193.222,68.05 199.81,68.05 200.089,68.329 200.089,68.593 199.732,68.95 J31.L4@199.5,68.95
  Layer 3 w0.075: v1(128.561,53.45) 128.916,53.45 128.96,53.494 128.96,53.572 128.959,53.573 128.959,64 136.045,71.086 144.055,71.086 144.217,71.249 v1(144.261,71.249)
SLOT8.LVDS_10_P: IC4.J6 J31.K4 | length 131.2
  TopLayer w0.095: v1(129.561,53.45) IC4.J6@130.061,52.95 ; v1(144.261,70.722) 144.317,70.722 144.469,70.874 145.726,70.874 147.091,70.874 147.23,70.735 147.23,69.421 147.499,69.152 147.962,69.152 148.231,69.421 148.231,71.079 148.37,71.218 148.649,71.218 148.788,71.079 148.788,69.421 149.057,69.152 149.52,69.152 149.789,69.421 149.789,71.079 149.928,71.218 150.207,71.218 150.346,71.079 150.346,69.421 150.615,69.152 151.078,69.152 151.347,69.421 151.347,71.079 151.486,71.218 151.765,71.218 151.904,71.079 151.904,69.899 152.173,69.63 152.636,69.63 152.905,69.899 152.905,71.079 153.044,71.218 153.323,71.218 153.462,71.079 153.462,69.899 153.731,69.63 154.194,69.63 154.463,69.899 154.463,71.079 154.602,71.218 154.881,71.218 155.02,71.079 155.02,69.421 155.289,69.152 155.752,69.152 156.021,69.421 156.021,71.079 156.16,71.218 156.439,71.218 156.578,71.079 156.578,69.421 156.847,69.152 157.31,69.152 157.579,69.421 157.579,71.079 157.718,71.218 157.997,71.218 158.136,71.079 158.136,69.421 158.405,69.152 158.868,69.152 159.137,69.421 159.137,71.079 159.276,71.218 159.555,71.218 159.694,71.079 159.694,69.421 159.963,69.152 160.426,69.152 160.695,69.421 160.695,71.079 160.834,71.218 161.113,71.218 161.252,71.079 161.252,69.421 161.521,69.152 161.984,69.152 162.253,69.421 162.253,71.079 162.392,71.218 162.671,71.218 162.81,71.079 162.81,69.421 163.079,69.152 163.542,69.152 163.811,69.421 163.811,71.079 163.95,71.218 164.229,71.218 164.368,71.079 164.368,69.421 164.637,69.152 165.1,69.152 165.369,69.421 165.369,70.735 165.508,70.874 165.621,70.874 168.141,70.874 173.302,65.712 174.085,65.712 190.976,65.712 191.198,65.712 193.314,67.828 199.902,67.828 200.311,68.237 200.311,68.593 200.668,68.95 J31.K4@200.9,68.95
  Layer 3 w0.075: v1(129.561,53.45) 129.206,53.45 129.162,53.494 129.162,53.655 129.161,53.656 129.161,63.916 136.129,70.884 144.055,70.884 144.217,70.722 v1(144.261,70.722)
SLOT8.LVDS_11_N: IC4.L2 J11.C8 | length 122.8
  TopLayer w0.095: v1(125.561,51.45) IC4.L2@126.061,50.95
  Layer 3 w0.075: v1(125.561,51.45) 125.561,51.095 125.517,51.051 123.45,51.051 122.946,51.555 122.946,52.222 122.575,52.593 122.185,52.982 122.185,66.69 141.043,85.548 160.159,85.548 166.97,92.359 211.165,92.359 211.492,92.031 211.519,92.005 211.686,91.837 cw(c211.603,91.753) 211.686,91.67 211.636,91.619 ccw(c211.72,91.536) 211.636,91.452 ccw(c211.72,91.536) 211.804,91.452 211.854,91.502 cw(c211.938,91.418) 212.022,91.502 212.203,91.32 212.23,91.294 212.699,90.825 212.699,90.489 212.699,90.343 212.306,89.95 J11.C8@212.1,89.95
SLOT8.LVDS_11_P: IC4.M2 J11.B8 | length 123.4
  TopLayer w0.095: v1(125.561,50.45) IC4.M2@126.061,49.95
  Layer 3 w0.075: v1(125.561,50.45) 125.561,50.805 125.517,50.849 123.366,50.849 122.744,51.471 122.744,52.138 122.361,52.521 121.983,52.899 121.983,66.774 140.959,85.75 160.075,85.75 166.886,92.561 211.249,92.561 211.635,92.174 212.901,90.909 212.901,90.405 212.901,90.343 213.293,89.95 J11.B8@213.5,89.95
SLOT8.LVDS_12_N: IC4.K2 J11.F8 | length 121.7
  TopLayer w0.095: v1(125.561,52.45) IC4.K2@126.061,51.95
  Layer 3 w0.075: v1(125.561,52.45) 125.916,52.45 125.96,52.406 125.96,52.178 125.832,52.05 124.147,52.05 123.904,52.293 122.936,53.261 122.936,66.08 139.406,82.55 143.369,82.55 148.378,82.55 159.243,82.55 168.141,91.448 181.286,91.448 183.996,88.738 183.996,87.18 185.864,85.312 190.085,85.312 196.221,91.448 207.609,91.448 207.789,91.448 207.851,91.386 cw(c207.768,91.302) 207.851,91.218 207.801,91.168 ccw(c207.885,91.084) 207.801,91.001 ccw(c207.885,91.084) 207.969,91.001 208.019,91.051 cw(c208.103,90.967) 208.187,91.051 208.319,90.918 208.346,90.892 208.499,90.739 208.499,90.311 208.138,89.95 J11.F8@207.9,89.95
SLOT8.LVDS_12_P: IC4.K3 J11.E8 | length 122.6
  TopLayer w0.095: v1(126.561,52.45) IC4.K3@127.061,51.95
  Layer 3 w0.075: v1(126.561,52.45) 126.206,52.45 126.162,52.406 126.162,52.094 125.916,51.848 124.063,51.848 123.832,52.079 122.734,53.177 122.734,66.163 139.323,82.752 143.369,82.752 148.378,82.752 159.159,82.752 168.057,91.65 181.37,91.65 184.198,88.822 184.198,87.263 185.947,85.514 190.001,85.514 196.137,91.65 207.873,91.65 208.701,90.822 208.701,90.311 209.062,89.95 J11.E8@209.3,89.95
SLOT8.LVDS_13_N: IC4.J3 J11.I8 | length 118.3
  TopLayer w0.095: v1(126.561,53.45) IC4.J3@127.061,52.95
  layer 8 w0.075: v1(126.561,53.45) 126.916,53.45 126.96,53.406 126.96,53.151 126.85,53.041 125.27,53.041 125.161,53.15 125.161,68.298 130.961,74.098 131.468,74.604 131.468,74.962 131.17,75.259 131.17,75.449 131.36,75.639 131.55,75.639 132.419,74.77 132.776,74.77 133.084,75.078 133.084,75.435 132.215,76.305 132.215,76.494 132.405,76.684 132.595,76.684 133.464,75.815 133.821,75.815 134.129,76.123 134.129,76.48 133.26,77.35 133.26,77.539 133.45,77.729 133.64,77.729 134.509,76.86 134.866,76.86 135.175,77.168 135.175,77.526 134.877,77.823 134.877,78.013 134.945,78.082 138.013,81.15 141.861,81.15 144.659,83.948 159.812,83.948 159.93,84.066 167.414,91.55 185.565,91.55 186.228,92.213 188.972,92.213 189.635,91.55 201.99,91.55 202.265,91.55 cw(c202.265,91.431) 202.383,91.431 202.383,91.361 ccw(c202.502,91.361) 202.62,91.361 202.62,91.431 cw(c202.739,91.431) 202.857,91.431 202.857,91.361 ccw(c202.976,91.361) 203.094,91.361 203.094,91.431 cw(c203.213,91.431) 203.213,91.55 203.748,91.55 203.811,91.55 204.299,91.062 204.299,90.501 204.299,90.355 203.894,89.95 J11.I8@203.7,89.95
SLOT8.LVDS_13_P: IC4.J4 J11.H8 | length 118.9
  TopLayer w0.095: v1(127.561,53.45) IC4.J4@128.061,52.95
  layer 8 w0.075: v1(127.561,53.45) 127.206,53.45 127.162,53.406 127.162,53.067 126.933,52.839 125.187,52.839 124.959,53.066 124.959,68.381 130.818,74.24 131.266,74.688 131.266,74.878 130.968,75.176 130.968,75.533 131.276,75.841 131.633,75.841 132.503,74.972 132.693,74.972 132.882,75.162 132.882,75.352 132.013,76.221 132.013,76.578 132.321,76.886 132.679,76.886 133.548,76.017 133.738,76.017 133.927,76.207 133.927,76.397 133.058,77.266 133.058,77.623 133.366,77.931 133.724,77.931 134.593,77.062 134.783,77.062 134.973,77.252 134.973,77.442 134.675,77.74 134.675,78.097 134.802,78.224 137.93,81.352 141.777,81.352 144.575,84.15 159.728,84.15 167.33,91.752 185.482,91.752 186.144,92.415 189.056,92.415 189.718,91.752 203.895,91.752 204.501,91.146 204.501,90.417 204.501,90.355 204.906,89.95 J11.H8@205.1,89.95
SLOT8.LVDS_14_N: IC4.G1 J11.L8 | length 123.1
  TopLayer w0.095: v1(124.561,55.45) IC4.G1@125.061,54.95
  Layer 3 w0.075: v1(124.561,55.45) 124.561,55.095 124.517,55.051 124.26,55.051 124.028,55.283 124.028,65.616 139.66,81.248 161.359,81.248 162.079,81.968 162.206,82.095 162.206,82.453 161.909,82.75 161.909,82.94 162.098,83.13 162.288,83.13 163.157,82.261 163.515,82.261 163.823,82.569 163.823,82.926 162.954,83.795 162.954,83.985 163.144,84.175 163.333,84.175 164.203,83.306 164.56,83.306 164.868,83.614 164.868,83.971 163.999,84.841 163.999,85.03 164.189,85.22 164.378,85.22 165.248,84.351 165.605,84.351 165.913,84.659 165.913,85.017 165.044,85.886 165.044,86.076 165.234,86.265 165.424,86.265 166.293,85.396 166.65,85.396 166.958,85.704 166.958,86.062 166.089,86.931 166.089,87.121 166.279,87.311 166.469,87.311 167.338,86.441 167.695,86.441 168.003,86.75 168.003,87.107 167.134,87.976 167.134,88.166 167.324,88.356 167.514,88.356 168.383,87.486 168.74,87.486 169.048,87.795 169.048,88.152 168.179,89.021 168.179,89.211 168.369,89.401 168.559,89.401 168.857,89.103 169.214,89.103 169.611,89.5 170.359,90.248 181.205,90.248 183.005,88.449 183.005,87.255 185.506,84.754 191.37,84.754 197.412,90.795 197.436,90.795 197.711,90.795 cw(c197.711,90.677) 197.829,90.677 197.829,90.606 ccw(c197.948,90.606) 198.066,90.606 198.066,90.677 cw(c198.185,90.677) 198.185,90.795 198.611,90.795 199.83,90.795 200.099,90.527 200.099,90.311 199.738,89.95 J11.L8@199.5,89.95
SLOT8.LVDS_14_P: IC4.H1 J11.K8 | length 123.7
  TopLayer w0.095: v1(124.561,54.45) IC4.H1@125.061,53.95
  Layer 3 w0.075: v1(124.561,54.45) 124.561,54.805 124.517,54.849 124.177,54.849 123.826,55.2 123.826,65.498 123.826,65.7 139.576,81.45 161.275,81.45 161.936,82.111 162.004,82.179 162.004,82.369 161.707,82.667 161.707,83.024 162.015,83.332 162.372,83.332 163.241,82.463 163.431,82.463 163.621,82.653 163.621,82.843 162.752,83.712 162.752,84.069 163.06,84.377 163.417,84.377 164.286,83.508 164.476,83.508 164.666,83.698 164.666,83.888 163.797,84.757 163.797,85.114 164.105,85.422 164.462,85.422 165.331,84.553 165.521,84.553 165.711,84.743 165.711,84.933 164.842,85.802 164.842,86.159 165.15,86.467 165.507,86.467 166.376,85.598 166.566,85.598 166.756,85.788 166.756,85.978 165.887,86.847 165.887,87.204 166.195,87.513 166.552,87.513 167.422,86.643 167.611,86.643 167.801,86.833 167.801,87.023 166.932,87.892 166.932,88.249 167.24,88.558 167.597,88.558 168.467,87.688 168.656,87.688 168.846,87.878 168.846,88.068 167.977,88.937 167.977,89.295 168.285,89.603 168.643,89.603 168.94,89.305 169.13,89.305 169.468,89.643 170.275,90.45 181.289,90.45 183.147,88.592 183.207,88.532 183.207,87.338 185.589,84.956 191.283,84.956 197.324,90.997 199.914,90.997 200.301,90.61 200.301,90.311 200.662,89.95 J11.K8@200.9,89.95
SLOT8.LVDS_15_N: IC4.K5 J33.L6 | length 120.9
  TopLayer w0.095: v1(128.561,52.45) IC4.K5@129.061,51.95
  layer 8 w0.075: v1(128.561,52.45) 128.561,52.095 128.605,52.051 131.929,52.051 132.175,51.805 132.175,50.736 132.859,50.052 144.845,50.052 144.963,49.934 145.004,49.893 145.197,49.7 145.197,31.299 145.466,31.029 155.19,31.029 156.21,32.049 156.675,32.049 156.959,32.333 156.959,33.649 157.362,34.052 160.121,34.052 161.497,32.676 162.729,31.444 163.269,30.904 168.481,30.904 172.499,26.886 172.568,26.817 172.597,26.788 ccw(c172.803,26.994) 173.009,26.788 173.76,27.538 cw(c174.108,27.189) 174.457,27.538 cw(c174.108,27.189) 174.487,26.872 174.487,26.869 173.707,26.09 ccw(c173.913,25.884) 173.707,25.677 174.352,25.032 174.421,24.964 175.784,23.601 185.091,23.601 187.662,21.03 189.039,19.653 189.307,19.653 189.404,19.653 189.563,19.813 189.563,21.536 189.84,21.813 190.326,21.813 190.604,21.536 190.604,19.786 190.763,19.627 191.082,19.627 191.241,19.786 191.241,21.536 191.518,21.813 192.004,21.813 192.282,21.536 192.282,19.786 192.441,19.627 192.76,19.627 192.919,19.786 192.919,21.536 193.196,21.813 193.682,21.813 193.96,21.536 193.96,19.8 194.119,19.641 194.438,19.641 194.597,19.8 194.597,21.536 194.874,21.813 195.36,21.813 195.638,21.536 195.638,19.813 195.797,19.653 197.114,19.653 197.521,19.653 198.918,21.05 200.01,21.05 200.099,21.139 200.099,21.589 199.738,21.95 J33.L6@199.5,21.95
SLOT8.LVDS_15_P: IC4.L5 J33.K6 | length 121.2
  TopLayer w0.095: v1(128.561,51.45) IC4.L5@129.061,50.95
  layer 8 w0.075: v1(128.561,51.45) 128.561,51.805 128.605,51.849 131.845,51.849 131.973,51.722 131.973,50.652 132.775,49.85 144.761,49.85 144.995,49.617 144.995,31.215 145.12,31.09 145.383,30.827 155.274,30.827 156.293,31.847 156.759,31.847 157.161,32.249 157.161,33.565 157.446,33.85 160.037,33.85 161.295,32.593 162.515,31.372 163.185,30.702 168.397,30.702 172.356,26.743 172.425,26.674 172.454,26.645 ccw(c172.803,26.994) 173.152,26.645 173.902,27.395 cw(c174.108,27.189) 174.315,27.395 cw(c174.108,27.189) 174.315,26.983 173.564,26.233 ccw(c173.913,25.884) 173.565,25.534 174.209,24.89 174.278,24.821 175.7,23.399 185.007,23.399 187.59,20.816 188.955,19.451 189.307,19.451 189.487,19.451 189.765,19.729 189.765,21.452 189.924,21.611 190.243,21.611 190.402,21.452 190.402,19.703 190.679,19.425 191.165,19.425 191.443,19.703 191.443,21.452 191.602,21.611 191.921,21.611 192.08,21.452 192.08,19.703 192.357,19.425 192.843,19.425 193.121,19.703 193.121,21.452 193.28,21.611 193.599,21.611 193.758,21.452 193.758,19.716 194.035,19.439 194.521,19.439 194.799,19.716 194.799,21.452 194.958,21.611 195.277,21.611 195.436,21.452 195.436,19.729 195.713,19.451 197.114,19.451 197.605,19.451 199.002,20.848 200.094,20.848 200.301,21.055 200.301,21.589 200.662,21.95 J33.K6@200.9,21.95
SLOT8_MGT.MGT_Rx_N: C448.2 IC4.C18 | length 41.8
  TopLayer w0.095: IC4.C18@142.061,58.95 v1(142.561,59.45)
  BottomLayer w0.095: v1(142.561,59.45) 142.561,59.117 142.617,59.061 142.884,59.061 142.961,59.138 142.961,61.835 cw(c145.72,61.835) 142.961,61.839 cw(c145.72,61.835) 143.767,63.784 cw(c145.72,61.835) 143.769,63.786 146.047,66.064 cw(c147.998,64.113) 146.049,66.066 cw(c147.998,64.113) 147.998,66.872 168.347,66.872 cw(c168.347,64.116) 170.296,66.065 171.352,65.009 ccw(c173.148,66.805) 173.148,64.265 176.8,64.265 ccw(c176.8,64.392) 176.89,64.302 ccw(c176.846,64.346) 176.909,64.346 cw(c176.971,64.346) 176.927,64.391 177.043,64.507 cw(c177.086,64.465) C448.2@177.086,64.525
SLOT8_MGT.MGT_Rx_P: C446.2 IC4.D18 | length 41.8
  TopLayer w0.095: IC4.D18@142.061,57.95 v1(142.561,58.45)
  BottomLayer w0.095: v1(142.561,58.45) 142.561,58.783 142.617,58.839 142.976,58.839 143.183,59.046 143.183,61.834 cw(c145.723,61.834) 143.927,63.63 146.203,65.906 cw(c147.999,64.11) 147.999,66.65 168.345,66.65 cw(c168.345,64.11) 170.141,65.906 171.196,64.851 ccw(c173.148,66.803) 173.148,64.043 176.8,64.043 cw(c176.8,63.916) 176.89,64.005 cw(c176.846,63.961) 176.909,63.961 ccw(c176.972,63.961) 176.927,63.917 177.043,63.8 ccw(c177.086,63.843) C446.2@177.086,63.782
SLOT8_MGT.MGT_Tx_N: C444.1 IC4.A19 | length 39.9
  TopLayer w0.095: IC4.A19@143.061,60.95 143.128,61.017 143.359,61.017 143.414,61.073 143.414,62.174 cw(c146.174,62.174) 143.414,62.178 cw(c146.174,62.174) 144.221,64.124 cw(c146.174,62.174) 144.223,64.126 147.761,67.664 cw(c149.712,65.713) 147.763,67.666 cw(c149.712,65.713) 149.712,68.472 168.111,68.472 cw(c168.111,65.716) 170.06,67.665 172.716,65.009 ccw(c174.512,66.805) 174.512,64.265 176.8,64.265 ccw(c176.8,64.392) 176.89,64.302 ccw(c176.846,64.346) 176.909,64.346 cw(c176.972,64.346) 176.927,64.391 177.043,64.507 cw(c177.086,64.465) C444.1@177.086,64.525
SLOT8_MGT.MGT_Tx_P: C442.1 IC4.B19 | length 40.5
  TopLayer w0.095: IC4.B19@143.061,59.95 143.093,59.982 143.093,60.327 143.636,60.871 143.636,62.173 cw(c146.176,62.173) 144.38,63.969 147.917,67.506 cw(c149.713,65.71) 149.713,68.25 168.109,68.25 cw(c168.109,65.71) 169.905,67.506 172.56,64.851 ccw(c174.512,66.803) 174.512,64.043 176.8,64.043 cw(c176.8,63.916) 176.89,64.005 cw(c176.846,63.961) 176.909,63.961 ccw(c176.971,63.961) 176.927,63.916 177.043,63.8 ccw(c177.086,63.843) C442.1@177.086,63.782
SRC_CLK_SEL_R: IC33.23 R155.2 | length 1.3
  TopLayer w0.127: R155.2@183.781,70.075 183.781,70.095 184.061,70.375 IC33.23@184.061,71.275
STRIP1: R71.1 | length 175.3
  Layer 3 w0.5: v8@37.77,0.176 39.955,0.176 44.081,-3.95 93.761,-3.95 94.561,-3.15 95.559,-3.15 96.295,-3.886 v3@117.411,-3.886 ; v3(117.411,-4.175) v3@117.411,-3.886 ; v3@209.223,-3.886 v3@117.411,-3.886
  BottomLayer w1: R71.1@36.674,0.15 36.674,0.137 v8(37.908,0.137)
  other v3: 209.25,-3.886
STRIP2: R69.1 | length 4.3
  BottomLayer w1: v3(42.386,-3.975) 42.711,-3.65 R69.1@42.711,0.15
  other v3: 95.576,-4.549
SYSEN_N: IC4.AP3 R286.1 R300.1 | length 64.7
  TopLayer w0.127: v1(126.561,27.45) IC4.AP3@127.061,27.95 ; R300.1@176.926,4.989 v2(177.581,4.989) R286.1@178.236,4.989
  Layer 5 w0.127: v1(126.561,27.45) 126.561,26.525 126.811,26.275 126.811,24.95 126.811,23.211 131.82,18.202 139.695,18.202 143.142,14.755 167.815,14.755 v2(177.581,4.989)
TxD_2V5: IC4.U9 IC20.4 TP17.1 | length 146.5
  TopLayer w0.127: v1(132.561,44.45) IC4.U9@133.061,44.95
  TopLayer w0.15: TP17.1@5.542,64.574 5.542,64.593 6.084,65.135 6.103,65.135 7.418,66.45 8.636,66.45 v2(9.897,65.189) IC20.4@11.201,65.189
  Layer 3 w0.1: v2(9.897,65.189) 14.176,65.189 14.725,65.737 17.612,68.625 25.386,68.625 25.821,69.06 28.226,69.06 28.327,68.959 28.675,68.959 29.534,68.1 30.461,68.1 33.307,65.254 40.732,65.254 42.036,63.95 45.286,63.95 48.036,61.2 58.411,61.2 62.636,65.425 75.386,65.425 77.761,63.05 v2(77.761,63.025)
  layer 8 w0.1: v2(77.761,63.025) 77.761,61.675 81.811,57.625 94.036,57.625 101.111,50.55 116.716,50.55 118.711,48.555 118.711,48.509 118.945,48.275 118.991,48.275 121.116,46.15 122.816,44.45 v1(132.561,44.45)
UART.CTS1: IC4.AL4 J5.63 | length 100.9
  TopLayer w0.127: v6(74.936,42.9) 75.286,43.25 79.811,43.25 83.653,47.092 87.652,47.092 93.219,52.659 93.219,55.292 91.427,57.084 88.724,57.084 J5.63@88.661,57.148 ; v1(127.561,30.45) IC4.AL4@128.061,30.95
  Layer 6 w0.127: v6(74.936,42.9) 73.561,42.9 71.211,40.55 71.211,35.825 78.577,28.459 90.195,28.459 90.261,28.525 107.786,28.525 109.386,30.125 119.486,30.125 119.761,29.85 126.961,29.85 v1(127.561,30.45)
UART.CTS2: IC4.AK8 J5.69 | length 108
  TopLayer w0.127: v6(76.554,45.375) 79.911,45.375 82.609,48.073 87.146,48.073 92.142,53.069 92.238,53.165 92.238,54.598 91.594,55.243 J5.69@88.661,55.243 ; v1(131.561,31.45) IC4.AK8@132.061,31.95
  Layer 6 w0.127: v6(76.554,45.375) 73.736,45.375 69.907,41.546 69.907,34.829 77.636,27.1 108.986,27.1 109.936,28.05 130.675,28.05 131.186,28.561 131.186,31.075 v1(131.561,31.45)
UART.RTS1: IC4.AL3 J5.61 | length 99.8
  TopLayer w0.127: v6(76.236,42.8) 76.286,42.75 80.011,42.75 84.026,46.765 87.901,46.765 93.546,52.41 93.546,55.64 91.467,57.719 88.724,57.719 J5.61@88.661,57.783 ; v1(126.561,30.45) IC4.AL3@127.061,30.95
  Layer 6 w0.127: v6(76.236,42.8) 75.911,42.475 73.661,42.475 71.635,40.449 71.635,35.926 78.036,29.525 93.924,29.525 94.499,28.95 107.336,28.95 108.738,30.352 119.959,30.352 120.225,30.086 125.712,30.086 126.075,30.45 v1(126.561,30.45)
UART.RTS2: IC4.AJ8 J5.71 | length 112.4
  TopLayer w0.127: v6(76.761,46.52) 76.788,46.493 80.379,46.493 82.881,48.995 87.511,48.995 91.911,53.395 91.911,54.1 91.404,54.608 J5.71@88.661,54.608 ; IC4.AJ8@132.061,32.95 v1(132.561,33.45)
  Layer 6 w0.127: v6(76.761,46.52) 74.256,46.52 69.464,41.728 69.464,34.647 77.636,26.475 109.661,26.475 110.861,27.675 113.361,27.675 114.561,26.475 121.786,26.475 123.124,27.813 131.699,27.813 132.136,28.25 132.136,31.539 132.236,31.639 132.236,31.9 132.197,31.939 132.197,33.086 v1(132.561,33.45)
UART.RX1: IC4.AK6 J5.59 | length 102.6
  TopLayer w0.127: v6(75.615,42.075) 79.905,42.075 84.268,46.438 88.174,46.438 93.873,52.137 93.873,55.988 91.507,58.354 88.724,58.354 J5.59@88.661,58.418 ; v1(129.561,31.45) IC4.AK6@130.061,31.95
  Layer 6 w0.127: v6(75.615,42.075) 73.911,42.075 72.027,40.191 72.027,36.184 78.291,29.92 97.691,29.92 97.961,29.65 106.961,29.65 107.966,30.655 110.276,30.655 110.48,30.859 128.292,30.859 128.375,30.943 128.529,30.943 128.672,31.086 128.712,31.086 129.075,31.45 v1(129.561,31.45)
UART.RX2: IC4.AL7 J5.67 | length 105
  TopLayer w0.127: v6(78.061,44.8) 80.036,44.8 82.982,47.746 87.282,47.746 92.373,52.838 92.469,52.933 92.565,53.029 92.565,54.821 91.508,55.878 J5.67@88.661,55.878 ; v1(130.561,30.45) IC4.AL7@131.061,30.95
  Layer 6 w0.127: v6(78.061,44.8) 73.911,44.8 70.35,41.239 70.35,35.136 77.886,27.6 108.236,27.6 109.111,28.475 119.361,28.475 119.699,28.813 129.749,28.813 130.093,29.157 130.093,29.982 v1(130.561,30.45)
UART.TX1: IC4.AK5 J5.57 | length 102.4
  TopLayer w0.127: v6(77.912,41.475) 79.95,41.475 84.275,45.8 88.286,45.8 94.43,51.944 94.43,56.181 91.622,58.989 88.724,58.989 J5.57@88.661,59.053 ; v1(128.561,31.45) IC4.AK5@129.061,31.95
  Layer 6 w0.127: v6(77.912,41.475) 73.836,41.475 72.427,40.066 72.427,36.309 77.586,31.15 83.161,31.15 84.164,30.147 88.324,30.147 88.727,30.55 103.736,30.55 105.036,31.85 110.711,31.85 111.475,31.086 128.197,31.086 v1(128.561,31.45)
UART.TX2: IC4.AJ6 J5.65 | length 110.8
  TopLayer w0.127: v6(77.054,43.9) 79.786,43.9 83.305,47.419 87.417,47.419 92.605,52.606 92.7,52.702 92.796,52.798 92.892,52.894 92.892,54.969 91.412,56.449 88.724,56.449 J5.65@88.661,56.513 ; v1(129.561,32.45) IC4.AJ6@130.061,32.95
  Layer 6 w0.127: v6(77.054,43.9) 73.811,43.9 70.753,40.842 70.753,35.533 78.211,28.075 106.586,28.075 106.686,28.175 108.086,28.175 109.293,29.382 113.043,29.382 113.361,29.7 119.311,29.7 119.936,29.075 126.786,29.075 127.586,29.875 128.5,29.875 128.924,30.299 128.924,30.328 129.6,31.004 129.665,31.004 129.911,31.25 129.911,31.314 130.665,32.068 130.693,32.068 131.161,32.536 131.161,33.65 130.836,33.975 129.536,33.975 129.036,33.475 129.036,32.975 v1(129.561,32.45)
USB_D_IN_N: D2.3 J23.2 | length 6.3
  TopLayer w0.129: J23.2@-2,63.95 -1.525,63.95 -1.326,64.149 1.512,64.149 2.293,64.93 2.293,65.587 2.596,65.89 2.596,66.289 D2.3@2.681,66.374
USB_D_IN_P: D2.1 J23.3 | length 5.9
  TopLayer w0.129: J23.3@-2,64.6 -1.525,64.6 -1.33,64.405 1.406,64.405 2.037,65.036 2.037,65.581 1.767,65.851 1.767,66.289 D2.1@1.681,66.374
USB_D_R_N: D2.4 IC18.7 | length 31.6
  TopLayer w0.129: v6(2.426,69.531) 2.389,69.494 2.389,69.073 2.681,68.781 D2.4@2.681,67.984 ; IC18.7@21.876,68.758 21.876,69.072 21.754,69.194 21.754,69.781 21.743,69.792 21.743,70.363 21.88,70.5 v1(21.88,70.574)
  layer 8 w0.102: v6(2.426,69.531) 2.426,69.604 2.29,69.739 2.29,70.089 2.426,70.224 6.785,70.224 8.76,72.2 15.411,72.2 15.99,71.621 23.536,71.621 23.761,71.396 23.761,70.073 22.988,69.3 22.23,69.3 21.715,69.815 21.715,70.365 21.88,70.53 v1(21.88,70.574)

## Text inside footprints (layer, text, board x,y; h text height)
J33: TopOverlay "8" at 194.85,25.6 h1 r90; TopOverlay "7" at 194.85,23.6 h1 r90; TopOverlay "6" at 194.85,21.6 h1 r90; TopOverlay "5" at 194.85,19.6 h1 r90; TopOverlay "4" at 194.85,17.6 h1 r90; TopOverlay "3" at 194.886,15.825 h1 r90; TopOverlay "2" at 194.811,14.35 h1 r90; TopOverlay "1" at 194.836,12.025 h1 r90; Mechanical14 "A" at 215.3,9.75 h1 r90; Mechanical14 "B" at 213.9,9.75 h1 r90; Mechanical14 "C" at 212.5,9.75 h1 r90; Mechanical14 "D" at 211.1,9.75 h1 r90; Mechanical14 "E" at 209.7,9.75 h1 r90; Mechanical14 "F" at 208.3,9.75 h1 r90; Mechanical14 "8" at 194.85,25.6 h1 r90; Mechanical14 "7" at 194.85,23.6 h1 r90; Mechanical14 "6" at 194.85,21.6 h1 r90; Mechanical14 "5" at 194.85,19.6 h1 r90; Mechanical14 "G" at 206.9,9.75 h1 r90; Mechanical14 "H" at 205.5,9.75 h1 r90; Mechanical14 "I" at 204.1,10 h1 r90; Mechanical14 "4" at 194.85,17.6 h1 r90; Mechanical14 "3" at 194.85,15.6 h1 r90; Mechanical14 "J" at 202.7,9.75 h1 r90; Mechanical14 "K" at 201.3,9.75 h1 r90; Mechanical14 "2" at 194.85,13.6 h1 r90; Mechanical14 "L" at 199.9,9.75 h1 r90; Mechanical14 "1" at 194.85,11.6 h1 r90; Mechanical8 "Edge of Daugher Card" at 217.65,15.725 h0.5 r90; Mechanical8 "Top Surface of Mother Board" at 229.15,14.575 h0.5 r90